# Altium PCB PCB1.PcbDoc
Units mm, origin at the board's own origin, x right, y up, seen from the top; angles counter-clockwise.
Board outline 124.33 x 100.71 mm, 2 copper layers (Top Layer, Bottom Layer); 39 components, 28 nets, 205 pads, 12 vias.
Unrouted connection lines stored in the file: 118.
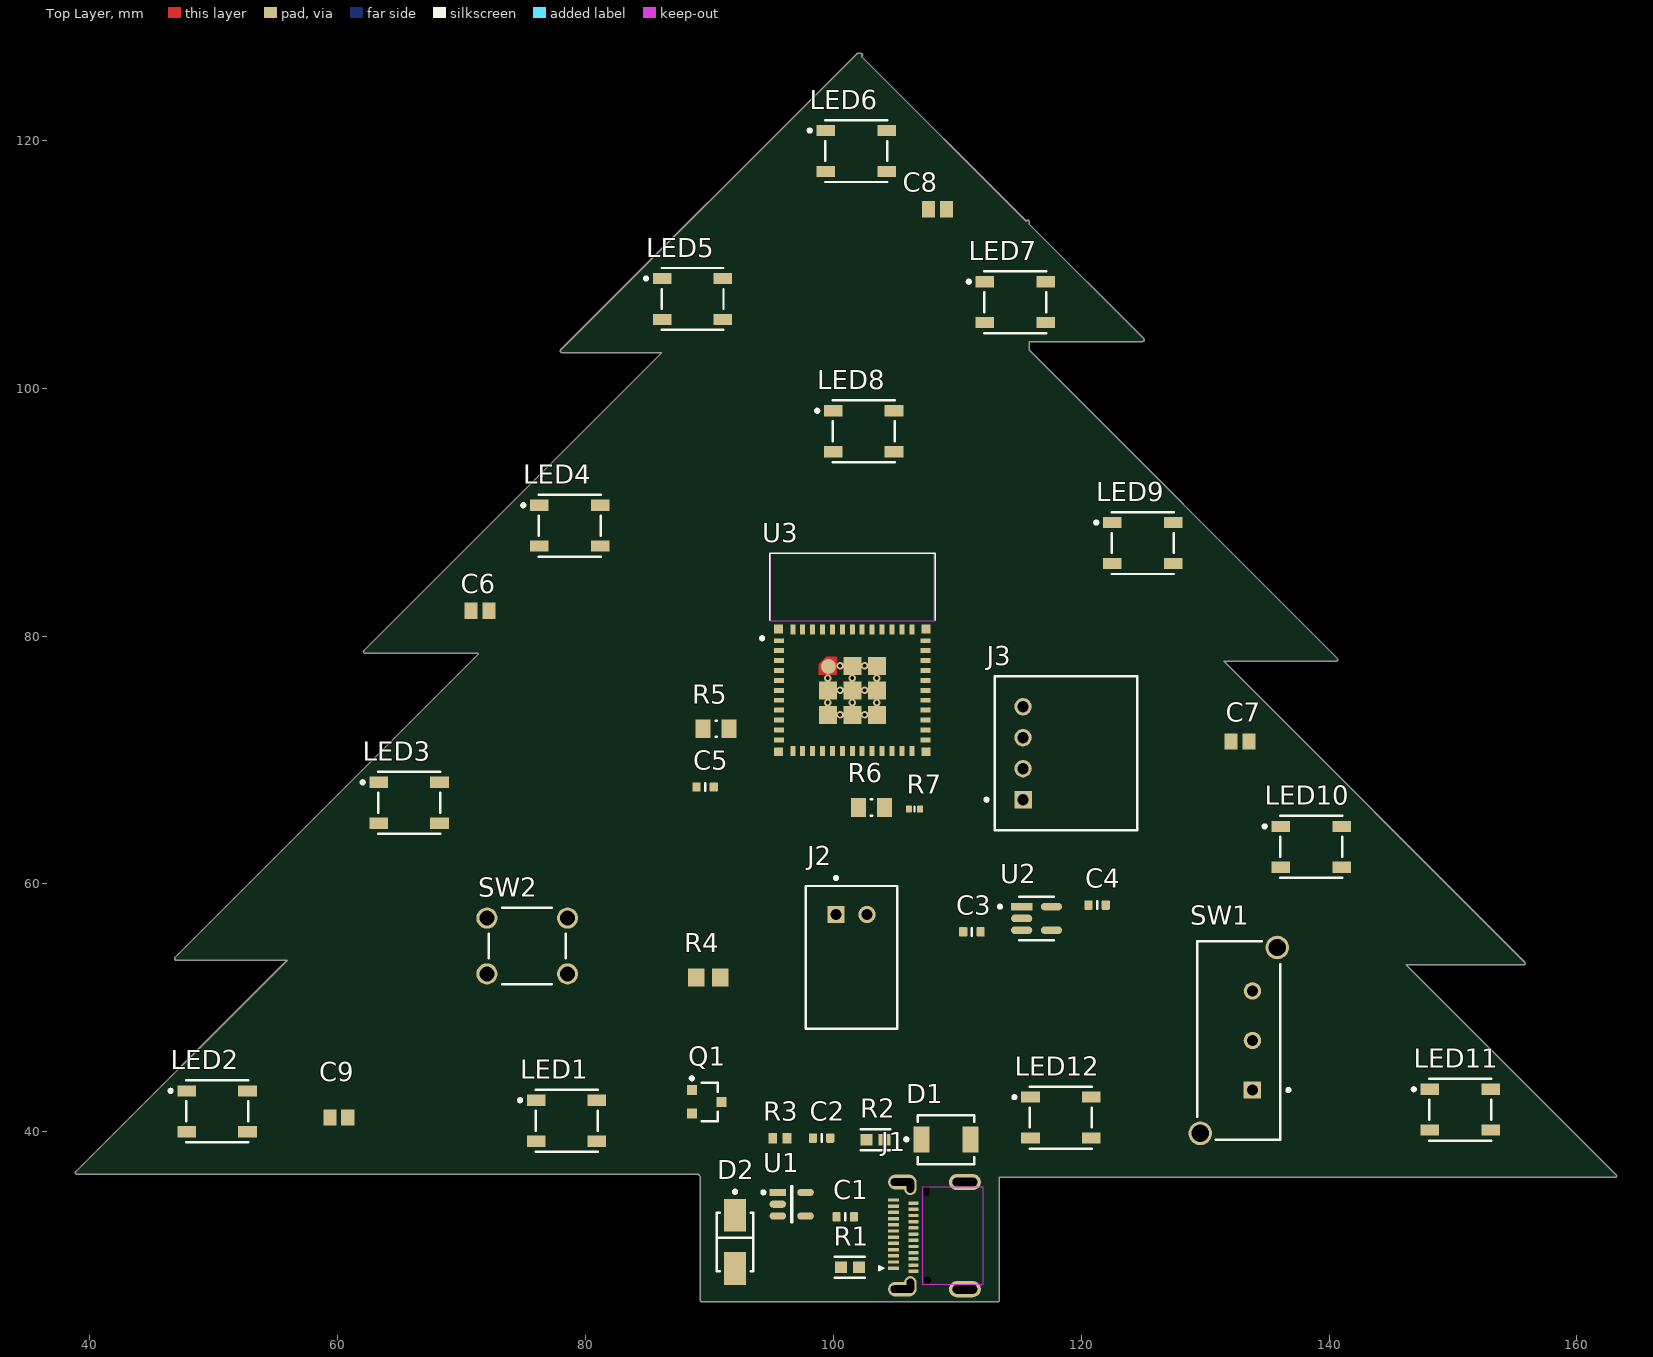
[diagram p0: Top Layer view]
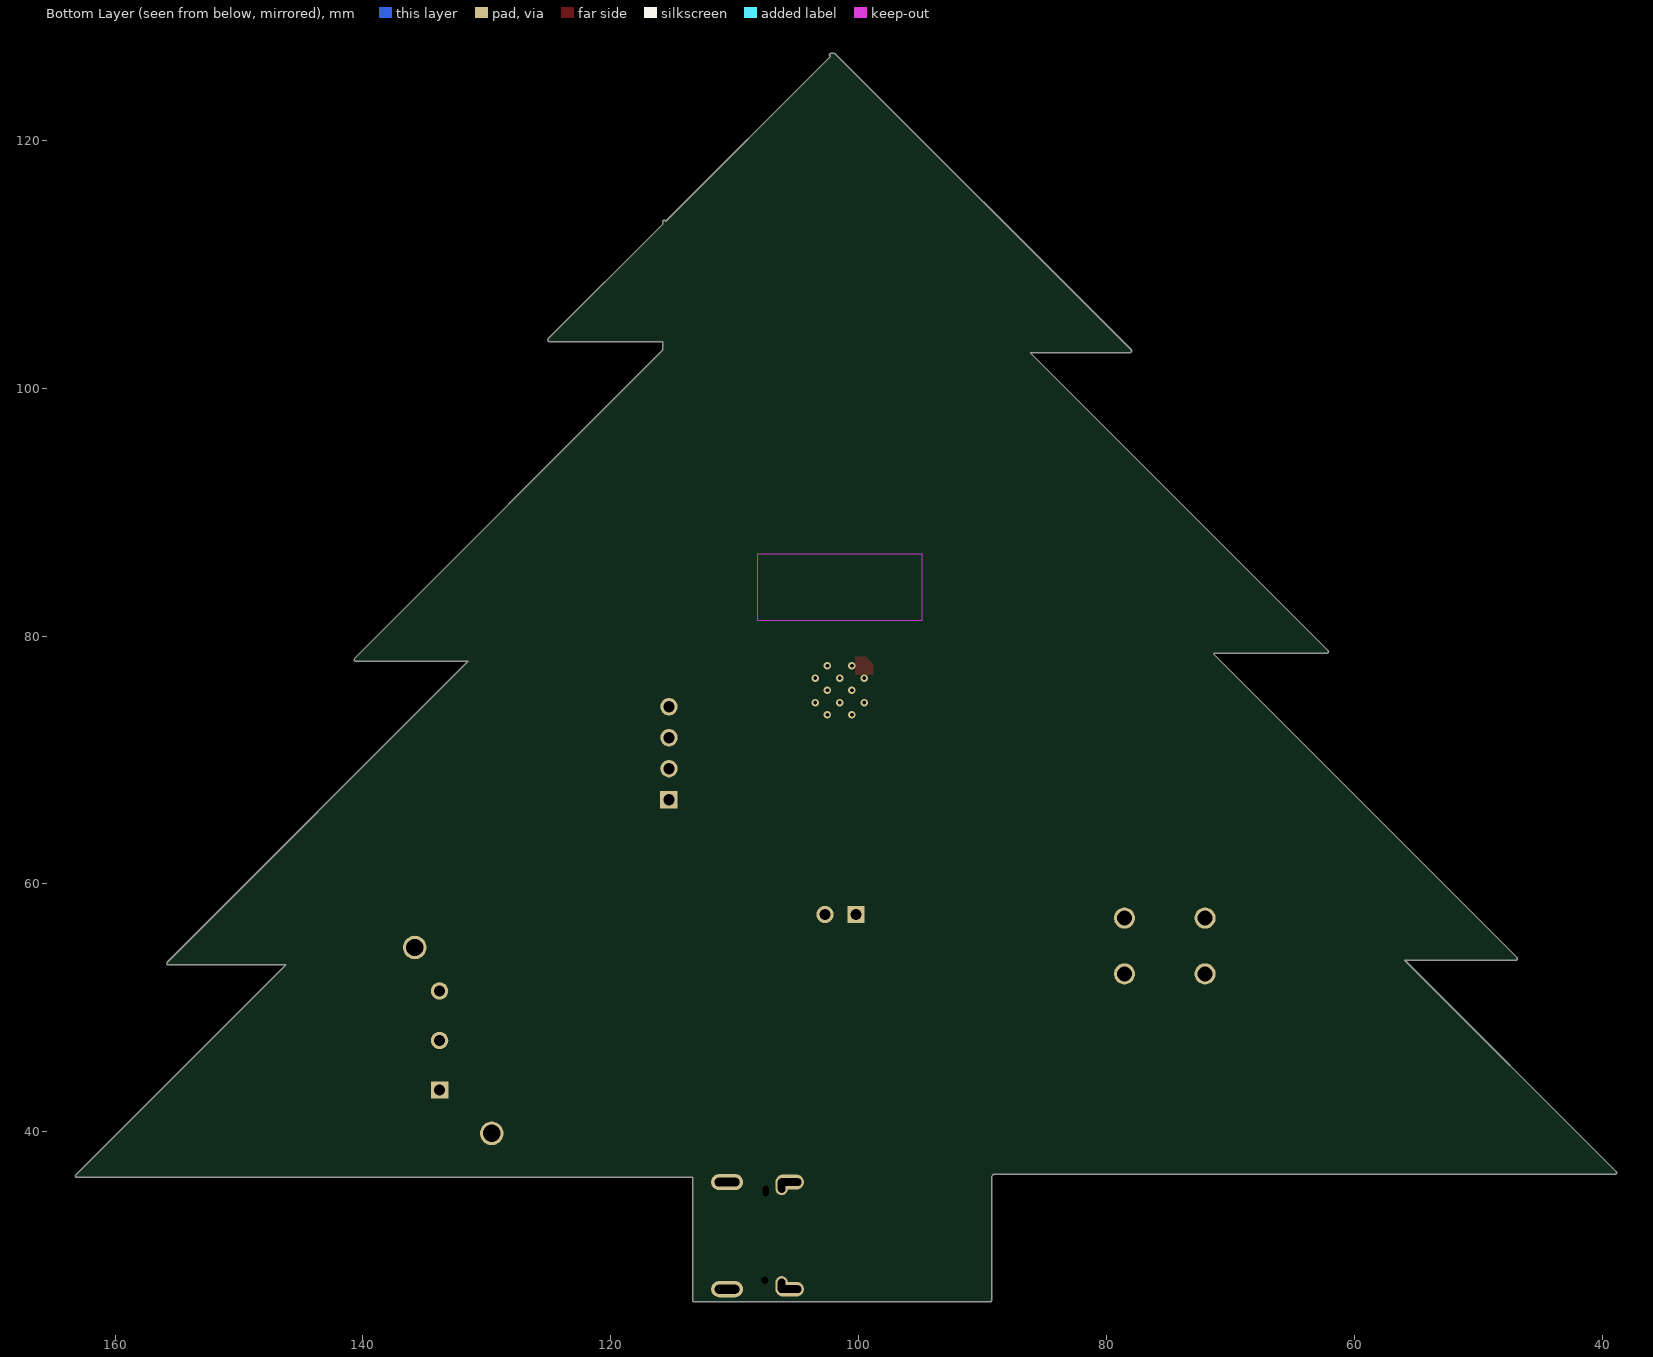
[diagram p1: Bottom Layer view, seen from below]

## Layer stack, top to bottom
Top Solder: solder mask 0.0102, Solder Resist, Dk 3.5
Top Layer: signal copper 0.0356
Dielectric 1: dielectric 0.32, FR-4, Dk 4.8
Bottom Layer: signal copper 0.0356
Bottom Solder: solder mask 0.0102, Solder Resist, Dk 3.5

## Board outline
38.989,36.576 cw(c38.989,36.703) 38.899,36.794 38.899,36.793 55.953,53.848 46.99,53.848 cw(c46.99,53.975) 46.9,54.066 46.9,54.065 71.374,78.539 71.321,78.613 62.23,78.613 cw(c62.23,78.74) 62.14,78.831 62.14,78.83 86.179,102.87 78.105,102.87 cw(c78.105,102.997) 78.015,103.088 78.015,103.087 101.891,126.963 101.981,127 102.235,127 cw(c102.235,126.873) 102.362,126.873 cw(c102.235,126.873) 102.28,126.754 115.578,113.456 cw(c115.697,113.411) 115.824,113.411 115.824,113.21 125.058,103.976 125.095,103.886 cw(c124.968,103.886) 124.968,103.759 115.824,103.759 115.824,103.05 140.679,78.195 140.716,78.105 cw(c140.589,78.105) 140.589,77.978 131.499,77.978 155.792,53.684 155.829,53.594 cw(c155.702,53.594) 155.702,53.467 146.231,53.467 163.158,36.539 163.195,36.449 cw(c163.068,36.449) 163.068,36.322 113.411,36.322 113.411,26.416 cw(c113.284,26.416) 113.284,26.289 89.408,26.289 cw(c89.408,26.416) 89.281,26.416 89.281,36.396 89.101,36.576

## Design rules (kind name [scope] priority, off if disabled: settings)
Clearance [All] p1: gap=0.254 ignorepadtopadclearanceinfootprint=FALSE
PolygonConnect [All] p1: connectstyle=Relief reliefconductorwidth=0.254 reliefentries=4 polygonreliefangle="90 Angle" airgapwidth=0.254
RoutingVias [All] p1: holewidth=0.711 width=1.27 viastyle="Through Hole" minholewidth=0.711 minwidth=1.27 maxholewidth=0.711 maxwidth=1.27
SolderMaskExpansion [All] p1: expansion=0 istentingtop=FALSE
SupplyNets "Schematic Supply Nets_1" [InNet('5V_USB')] p1: voltage=0.000
SupplyNets "Schematic Supply Nets" [InNet('GND')] p2: voltage=0.000
Width [All] p1: maxlimit=0.254 minlimit=0.254 preferedwidth=0.254
30 further rules are at their usual default settings.

## Components (designator, comment, footprint, x,y, rotation, side; value= is the part's Value field where it differs from the comment)
C1 "Capacitor 470nF +/-20% 25V 0603" CAPC0603(1608)100_L 100.965,33.147 r0 top value=470nF
C2 "Capacitor 470nF +/-20% 25V 0603" CAPC0603(1608)100_L 99.06,39.497 r0 top value=470nF
C3 "Capacitor 470nF +/-20% 25V 0603" CAPC0603(1608)100_L 111.187,56.134 r0 top value=470nF
C4 "Capacitor 470nF +/-20% 25V 0603" CAPC0603(1608)100_L 121.285,58.293 r0 top value=470nF
C5 "Capacitor 470nF +/-20% 25V 0603" CAPC0603(1608)100_L 89.662,67.818 r0 top value=470nF
C6 "Capacitor 100 nF +/-10% 50 V 0805" CAPC2013X95X50LL10T25 71.501,82.042 r0 top value=100nF
C7 "Capacitor 100 nF +/-10% 50 V 0805" CAPC2013X95X50LL10T25 132.805,71.501 r0 top value=100nF
C8 "Capacitor 100 nF +/-10% 50 V 0805" CAPC2013X95X50LL10T25 108.421,114.427 r0 top value=100nF
C9 "Capacitor 100 nF +/-10% 50 V 0805" CAPC2013X95X50LL10T25 60.108,41.148 r0 top value=100nF
D1 "TVS" FP-SMBJ-MFG 109.093,39.37 r0 top
D2 "Diode Schottky" FP-403AE-MFG 92.075,31.115 r90 top
J1 "Type-C Connector" JAE-DX07S024JJ3_V 107.569,31.623 r90 top
J2 "Battery connector" JST-S2B-XH-A(LF)(SN)_V 101.473,57.531 r0 top
J3 "UART Programming Header" JST-S4B-XH-A(LF)(SN)_V 115.316,70.545 r90 top
LED1 "WS2812B" ADAI-WS2812B_V 78.486,40.894 r0 top
LED2 "WS2812B" ADAI-WS2812B_V 50.292,41.656 r0 top
LED3 "WS2812B" ADAI-WS2812B_V 65.786,66.548 r0 top
LED4 "WS2812B" ADAI-WS2812B_V 78.74,88.9 r0 top
LED5 "WS2812B" ADAI-WS2812B_V 88.646,107.188 r0 top
LED6 "WS2812B" ADAI-WS2812B_V 101.854,119.126 r0 top
LED7 "WS2812B" ADAI-WS2812B_V 114.681,106.934 r0 top
LED8 "WS2812B" ADAI-WS2812B_V 102.452,96.521 r0 top
LED9 "WS2812B" ADAI-WS2812B_V 124.968,87.503 r0 top
LED10 "WS2812B" ADAI-WS2812B_V 138.557,62.992 r0 top
LED11 "WS2812B" ADAI-WS2812B_V 150.585,41.784 r0 top
LED12 "WS2812B" ADAI-WS2812B_V 118.364,41.148 r0 top
Q1 "P-MOSFET" AO-SOT-23-3L_V 89.789,42.418 r0 top
R1 "5.1 kOm" FP-MCR03-IPC_B 101.346,29.083 r0 top value=5.1kR
R2 "5.1 kOm" FP-MCR03-IPC_B 103.413,39.37 r0 top value=5.1kR
R3 "2 kOm" RESC1609X50X30LL10T20 95.691,39.497 r0 top
R4 "Resistor 100k +/-1% 0805 125 mW" RESC2013X70X40ML20T20 89.916,52.451 r0 top value=100k
R5 "Resistor 10k +/-1% 0805 125 mW" RESC2013X50X35ML15T15 90.551,72.517 r0 top value=10k
R6 "Resistor 10k +/-1% 0805 125 mW" RESC2013X50X35ML15T15 103.09,66.167 r0 top value=10k
R7 "Resistor 330R +/-5 % 0402 63 mW" RESC0402(1005)_L 106.553,66.04 r0 top value=330
SW1 "Main Power Switch" TECO-1825255-1_V 132.715,47.371 r90 top
SW2 "Reset Push Button" BEST-TS-1109_V 75.311,54.991 r0 top
U1 "Battery Charger" FP-C04-091-OT-IPC_B 96.647,34.163 r0 top
U2 "LDO" FP-SOT25-IPC_A 116.401,57.216 r0 top
U3 "ESP32-C3 Main Microcontroller Module" FP-ESP32-C3-MINI-1-H4-MFG 101.537,75.618 r0 top

## Footprints (in the part's own frame and the unit in brackets; to place one, negate y for a bottom-side part, rotate by r counter-clockwise, add the part's x,y. Pads: shape width x height; smd on the part's side, far side on the other; paste and mask are expansions set on the pad)
ADAI-WS2812B_V [mm] "SMD, 4-Leads, Body 5x5mm, Pitch 3.3mm"
  rect 1.5x0.9 smd: 1(-2.45,1.65) 2(-2.45,-1.65) 3(2.45,-1.65) 4(2.45,1.65)
  silkscreen extent -3.87,-2.5 2.5,2.5, body extent -2.7,-2.5 2.7,2.5, height 1.69
AO-SOT-23-3L_V [mm] "SOT23, 3-Leads, Body 3.1x1.8mm, Pitch 0.95mm"
  rect 0.8x0.8 smd: 1(-1.2,0.95) 2(-1.2,-0.95) 3(1.2,0)
  silkscreen extent -1.32,-1.55 0.9,2.02, body extent -1.5,-1.55 1.5,1.55, height 1.25
BEST-TS-1109_V [mm] "THD, 4-Leads, Body 6.2x6.2mm"
  round 1.7 hole 1.2: 1(-3.25,2.25) 2(3.25,2.25) 3(-3.25,-2.25) 4(3.25,-2.25)
  silkscreen extent -3.1,-3.1 3.1,3.1
CAPC0603(1608)100_L [mm] "Chip Capacitor, Body 1.6x0.8mm, Height 1.0mm, IPC High Density"
  rrect25% 0.66x0.76 smd: 1(-0.7,0) 2(0.7,0)
  silkscreen extent 0,-0.3 0,0.3, body extent -0.8,-0.4 0.8,0.4, height 0.95
CAPC2013X95X50LL10T25 [mm] "Chip Capacitor, 2-Leads, Body 2.10x1.35mm, IPC High Density"
  rect 1.05x1.3 smd: 1(-0.725,0) 2(0.725,0)
  body extent -1.05,-0.67 1.05,0.67, height 0.95
FP-403AE-MFG [mm]
  rect 2.65x1.75 smd paste+0 mask+0: 1(-2.15,0) 2(2.15,0)
  silkscreen extent -2.37,-1.48 4.17,1.48, body extent -3.57,-1.58 3.57,1.58, height 0.25
FP-C04-091-OT-IPC_B [mm]
  rect 1.338x0.578 smd paste+0 mask+0: 1(-1.116,0.95)
  rrect100% 1.338x0.578 smd paste+0 mask+0: 2(-1.116,0) 3(-1.116,-0.95) 4(1.116,-0.95) 5(1.116,0.95)
  silkscreen extent -2.41,-1.45 0.05,1.45
FP-ESP32-C3-MINI-1-H4-MFG [mm]
  rect 0.8x0.4 smd paste+0 mask+0: 1(-5.9,4) 2(-5.9,3.2) 3(-5.9,2.4) 4(-5.9,1.6) 5(-5.9,0.8) 6(-5.9,0) 7(-5.9,-0.8) 8(-5.9,-1.6) 9(-5.9,-2.4) 10(-5.9,-3.2) 11(-5.9,-4) 25(5.9,-4) 26(5.9,-3.2) 27(5.9,-2.4) 28(5.9,-1.6) 29(5.9,-0.8) 30(5.9,0) 31(5.9,0.8) 32(5.9,1.6) 33(5.9,2.4) 34(5.9,3.2) 35(5.9,4)
  rect 0.4x0.8 smd paste+0 mask+0: 12(-4.8,-4.9) 13(-4,-4.9) 14(-3.2,-4.9) 15(-2.4,-4.9) 16(-1.6,-4.9) 17(-0.8,-4.9) 18(0,-4.9) 19(0.8,-4.9) 20(1.6,-4.9) 21(2.4,-4.9) 22(3.2,-4.9) 23(4,-4.9) 24(4.8,-4.9) 36(4.8,4.9) 37(4,4.9) 38(3.2,4.9) 39(2.4,4.9) 40(1.6,4.9) 41(0.8,4.9) 42(0,4.9) 43(-0.8,4.9) 44(-1.6,4.9) 45(-2.4,4.9) 46(-3.2,4.9) 47(-4,4.9) 48(-4.8,4.9)
  rect 1.45x1.45 smd paste+0 mask+0: 49(-1.975,-1.975) 49(-1.975,0) 49(0,-1.975) 49(0,0) 49(0,1.975) 49(1.975,-1.975) 49(1.975,0) 49(1.975,1.975)
  round 1.207 smd paste+0 mask+0: 49(-1.926,1.926)
  rect 0.7x0.7 smd paste+0 mask+0: 50(5.95,4.95) 51(5.95,-4.95) 52(-5.95,-4.95) 53(-5.95,4.95)
  Top Layer region: -2.7,1.25 -2.7,2.1 -2.1,2.7 -1.25,2.7 -1.25,1.25
  Keep-Out Layer region: -6.6,5.6 6.6,5.6 6.6,11 -6.6,11
  silkscreen extent -7.4,4.08 6.68,11.07, body extent -6.78,-5.77 6.78,11.17, height 0.25
FP-MCR03-IPC_B [mm]
  rect 0.958x0.912 smd paste+0 mask+0: 1(-0.727,0) 2(0.727,0)
  silkscreen extent -1.21,-0.86 1.21,0.86, body extent -1.46,-0.71 1.46,0.71, height 0.25
FP-SMBJ-MFG [mm]
  rect 1.27x2.1 smd paste+0 mask+0: 1(-1.98,0) 2(1.98,0)
  silkscreen extent -3.32,-1.97 2.28,1.97, body extent -2.72,-2.07 2.72,2.07, height 0.25
FP-SOT25-IPC_A [mm]
  rect 1.707x0.616 smd paste+0 mask+0: 1(-1.201,0.95)
  rrect100% 1.707x0.616 smd paste+0 mask+0: 2(-1.201,0) 3(-1.201,-0.95) 4(1.201,-0.95) 5(1.201,0.95)
  silkscreen extent -3.08,-1.75 1.4,1.75, body extent -2.55,-2 2.55,2, height 0.25
JAE-DX07S024JJ3_V [mm] "THD, 24-Leads, Body 8.17x8.94mm, Pitch 0.5mm"
  oval 1.2x2.3 hole 0.6 slot 1.9 at 90 deg: 1(-4.32,2) 2(4.32,2)
  oval 1.5x1 hole 0.6 slot 1.1 at 0 deg: 1(-4.02,1.35) 2(4.02,1.35)
  oval 1.3x2.6 hole 0.7 slot 2 at 90 deg: 3(-4.32,-3.05) 4(4.32,-3.05)
  rrect25% 0.27x0.9 smd: A1(-2.625,2.7) A2(-2.125,2.7) A3(-1.625,2.7) A4(-1.125,2.7) A5(-0.625,2.7) A6(-0.125,2.7) A7(0.375,2.7) A8(0.875,2.7) A9(1.375,2.7) A10(1.875,2.7) A11(2.375,2.7) A12(2.875,2.7)
  rrect25% 0.27x0.8 smd: B1(2.625,1.1) B2(2.125,1.1) B3(1.625,1.1) B4(1.125,1.1) B5(0.625,1.1) B6(0.125,1.1) B7(-0.375,1.1) B8(-0.875,1.1) B9(-1.375,1.1) B10(-1.875,1.1) B11(-2.375,1.1) B12(-2.875,1.1)
  round 0 hole 0.6 unplated: H1(-3.6,0)
  round 0 hole 0.5 slot 0.85 at 0 deg unplated: H2(3.6,0.065)
  Top Layer keep-out region: -3.9,-4.55 3.9,-4.55 3.9,0.4 -3.9,0.4
  silkscreen extent -2.83,3.49 -2.43,3.89, body extent -4.47,-5.35 4.47,2.8, height 3.16
JST-S2B-XH-A(LF)(SN)_V [mm] "Header, 2-Leads, Body 7.4x11.5mm, Pitch 2.5mm"
  rect 1.4x1.4 hole 0.9: 1(-1.25,0)
  round 1.4 hole 0.9: 2(1.25,0)
  silkscreen extent -3.7,-9.2 3.7,3.08, body extent -3.7,-9.2 3.7,2.3, height 5.95
JST-S4B-XH-A(LF)(SN)_V [mm] "Header, 4-Leads, Body 12.4x11.5mm, Pitch 2.5mm"
  rect 1.4x1.4 hole 0.9: 1(-3.75,0)
  round 1.4 hole 0.9: 2(-1.25,0) 3(1.25,0) 4(3.75,0)
  silkscreen extent -6.2,-9.2 6.2,3.07, body extent -6.2,-9.2 6.2,2.3, height 6.15
RESC0402(1005)_L [mm] "Chip Resistor, Body 1.0x0.5mm, IPC High Density"
  rrect25% 0.5x0.55 smd: 1(-0.45,0) 2(0.45,0)
  silkscreen extent 0,-0.2 0,0.2, body extent -0.5,-0.25 0.5,0.25, height 0.3
RESC1609X50X30LL10T20 [mm] "Chip Resistor, 2-Leads, Body 1.55x0.85mm, IPC High Density"
  rect 0.7x0.85 smd: 1(-0.575,0) 2(0.575,0)
  body extent -0.82,-0.48 0.82,0.48, height 0.5
RESC2013X50X35ML15T15 [mm] "Chip Resistor, 2-Leads, Body 2.2x1.4mm, IPC Low Density"
  rect 1.2x1.5 smd: 1(-1.05,0) 2(1.05,0)
  silkscreen extent -0.05,-0.65 0.05,0.65, body extent -1.1,-0.7 1.1,0.7, height 0.5
RESC2013X70X40ML20T20 [mm] "Chip Resistor, 2-Leads, Body 2.2x1.35mm, IPC Low Density"
  rect 1.35x1.45 smd: 1(-0.975,0) 2(0.975,0)
  body extent -1.1,-0.67 1.1,0.67, height 0.7
TECO-1825255-1_V [mm] "THD, 5-Leads, Body 6.7x16mm, Pitch 4mm"
  rect 1.4x1.4 hole 0.9: 1(-4,-1.1)
  round 1.4 hole 0.9: 2(0,-1.1) 3(4,-1.1)
  round 1.9 hole 1.4: MH1(-7.5,3.1) MH2(7.5,-3.1)
  silkscreen extent -8,-4.13 8,3.35, body extent -8,-3.35 8,3.35, height 12

## Part data
C1 C2 C3 C4 C5: library part CMP-001-00077-3, "Chip Capacitor, 470nF +/-20%, 25V, 0603, Thickness 1 mm", Case/Package=0603, Max Operating Temperature=85°C, Min Operating Temperature=-55°C, Tolerance=10%, Voltage Rating=25V, Mounting Technology=SMT, Pins=2
C6 C7 C8 C9: library part CMP-001-00018-6, "Chip Capacitor, 100 nF, +/- 10%, 50 V, 0805 (2012 Metric)", Capacitor Type=Ceramic, Case/Package=0805, Max Operating Temperature=125°C, Min Operating Temperature=-55°C, Tolerance=10%, Voltage Rating=50V, Mounting Technology=SM, Pins=2, RoHS Compliant=True
D1: library part CMP-07401-000003-1, "TVS DIODE 5V 9.2V SMB", Breakdown Voltage=6.4V, Clamping Voltage=9.2V, Manufacturer="Bourns Inc.", Manufacturer Part Number=SMBJ5.0A, Max Junction Temp=+150°C, Package=SMBJ, Peak Pulse Current=65.3A, Peak Pulse Power=600W, Reverse Standoff Voltage=5V, Temperature="-55°C to +150°C", Temperature Range Low=-55°C, Automotive=No, Category=Diode, ComponentLink2Description=Datasheet, ComponentLink2URL=https://www.bourns.com/docs/Product-Datasheets/SMBJ.pdf, Device Class L1="Circuit Protection", Device Class L2="TVS Diodes", Device Class L3=unset, Digikey Description="TVS DIODE 5V 9.2V SMB", Direction=Unidirectional, Height=2.44mm, Lead Free=Yes, Mouser Description="Dio Tvs Vwm 5.0V 600W Unidir Smb Rohs Compliant: Yes", Number Of Channels=1, Octopart=https://octopart.com/smbj5.0a-bourns-12809487, RoHS=TRUE, Standoff Height=0.05mm, Temperature Range High=+150°C
D2: library part CMP-2000-04943-2, "DIODE SCHOTTKY 40V 1A SMA", Forward Current=1A, Manufacturer="ON Semiconductor", Manufacturer Part Number=SS14, Max Junction Temp=+125°C, Max Repetitive Reverse Voltage=40V, Max Surge Forward Current=40A, Package=403AE, Peak Reverse Current=0.2mA, Temperature="-65°C to +125°C", Temperature Range Low=-65°C, Automotive=No, Category=Diode, ComponentLink2Description=Datasheet, ComponentLink2URL=https://www.onsemi.com/pub/Collateral/SS19-D.PDF, Device Class L1="Discrete Semiconductors", Device Class L2=Diodes, Device Class L3="Schottky Diodes", Digikey Description="DIODE SCHOTTKY 40V 1A SMA", Height=2.5mm, Lead Free=Yes, Mouser Description="Schottky Diodes & Rectifiers SMA 40V 1.0A", Octopart=https://octopart.com/ss14-on+semiconductor-29205033, RoHS=TRUE, Standoff Height=0.05mm, Temperature Range High=+125°C
J1: library part CMP-002-00065-3, "USB-C Connector, 20 V, 1.25 A, -30 to 80 degC, RoHS, Tape and Reel", Connector Type=USB-C, Gender=Receptacle, Pins=28
J2: library part CMP-002-00032-2, "Male Header, Pitch 2.5 mm, 1 x 2 Position, Height 6.1 mm, Tail Length 3.4 mm, -25 to 85 degC, RoHS, Bulk", Case/Package=S2B-XH-A(LF)(SN), Manufacturer=JST, Max Operating Temperature=85°C, Min Operating Temperature=-25°C, Package Description="XH Series Disconnectable Crimp Style Connector, Pitch 2.5 mm, 1 x 2 Position, Height 6.1 mm, Tail Length 3.4 mm", Connector Type=Header, Datasheet URL=http://www.jst-mfg.com/product/pdf/eng/eXH.pdf, Datasheet Version=May-16, Gender=Male, Manufacturer URL=http://www.jst.com/home2.html, Mounting Technology=TH, Package Reference=S2B-XH-A(LF)(SN), RoHS Compliant=Unknown
J3: library part CMP-002-00034-2, "Male Header, Pitch 2.5 mm, 1 x 4 Position, Height 6.1 mm, Tail Length 3.4 mm, -25 to 85 degC, RoHS, Bulk", Case/Package=S4B-XH-A(LF)(SN), Manufacturer=JST, Max Operating Temperature=85°C, Min Operating Temperature=-25°C, Package Description="XH Series Disconnectable Crimp Style Connector, Pitch 2.5 mm, 1 x 4 Position, Height 6.1 mm, Tail Length 3.4 mm", Connector Type=Header, Datasheet URL=http://www.jst-mfg.com/product/pdf/eng/eXH.pdf, Datasheet Version=May-16, Gender=Male, Manufacturer URL=http://www.jst.com/home2.html, Mounting Technology=TH, Package Reference=S4B-XH-A(LF)(SN), RoHS Compliant=Unknown
LED1 LED2 LED3 LED4 LED5 LED6 LED7 LED8 LED9 LED10 LED11 LED12: library part CMP-007-00035-2, "Intelligent Control LED Integrated Light Source, 3.5 to 5.3 V, -25 to 80 degC, 4-Pin SMD, RoHS, Bulk", Manufacturer="Adafruit Industries", Package Description="4-Pin Surface Mount Device, Body 5 x 5 mm, Pitch 3.3 mm", Case/Package=WS2812B, Datasheet URL=https://cdn-shop.adafruit.com/datasheets/WS2812B.pdf, Datasheet Version=May-13, Manufacturer URL=https://www.adafruit.com/, Mounting Technology=SM, Package Reference=WS2812B, RoHS Compliant=False
Q1: library part CMP-2000-05778-1, "P-Channel MOSFET, 30 V, 4 A, -55 to 150 degC, 3-Pin SOT-23-3L, RoHS, Tape and Reel", Continuous Drain Current=4A, Drain-Source On-Volt=30V, Frequency (Max)=NotRequiredMHz, Gate-Source Voltage (Max)=?12V, Manufacturer="Alpha and Omega", Operating Temp Range=-55Cto150C, Operating Temperature Classification=Military, Output Power (Max)=NotRequiredW, Package Description="3-Pin Small Outline Transistor, Body 2.95 x 1.6 mm, Pitch 0.95 mm", Package Reference=SOT-23-3L, Package Type=SOT-23, Power Dissipation=1.4W, Power Gain=NotRequireddB, Channel Mode=Enhancement, Datasheet URL=http://www.aosmd.com/res/data_sheets/AO3401A.pdf, Datasheet Version="Rev. 3, 03/2011", Drain Current (Max)=4A, Drain Efficiency=NotRequired%, Drain-Source On-Res=0.044ohm, Manufacturer URL=http://www.aosmd.com/, Mounting=SurfaceMount, Mounting Technology=SurfaceMount, Noise Figure=NotRequireddB, Number of  Elements=1, Package URL=http://www.aosmd.com/res/packaging_information/SOT-23-3L.pdf, Pin Count=3, Polarity=P, Rad Hardened=No, Type=PowerMOSFET
R1 R2: library part CMP-08839-027005-1, "Thick Film Chip Resistor, 0603, 5.1kΩ, 5%, 200ppm/°C, 0.1W, 50V", Case Code (Imperial)=0603, Case Code (Metric)=1608, Max Operating Temperature=155°C, Max Power Dissipation=100mW, Min Operating Temperature=-55°C, Package Quantity=5000, Resistance=5.1kR, Resistor Type="Thick Film", Temperature Coefficient=200ppm/°C, Tolerance=5%, Voltage Rating (DC)=50V, Case/Package=0603, Contact Plating=Tin, Features="Automotive AEC-Q200", Height=0.022inch, Lead Free="Lead Free", Length=0.063inch, Mount="Surface Mount", Number of Terminations=2, Packaging="Tape and Reel", Power Rating=100mW, RoHS Compliant=Yes, Series=MCR, Technology="THICK FILM", Width=0.031inch, Working Voltage=50V
R3: library part CMP-2000-03162-1, Manufacturer="Vishay Dale", Part Number=CRCW06032K00FKTA
R4: library part CMP-009-00024-5, "Chip Resistor, 100 KOhm, +/- 1%, 0.125 W, -55 to 155 degC, 0805 (2012 Metric)", Case/Package=0805, Max Operating Temperature=155°C, Min Operating Temperature=-55°C, Power=125mW, Tolerance=1%, Voltage Rating=150V, Mounting Technology=SM, Pins=2, RoHS Compliant=True
R5 R6: library part CMP-009-00018-5, "Chip Resistor, 10 KOhm, +/- 1%, 125 mW, -55 to 155 degC, 0805 (2012 Metric)", Case/Package=0805, Max Operating Temperature=155°C, Min Operating Temperature=-55°C, Power=125mW, Tolerance=1%, Voltage Rating=150V, Mounting Technology=SM, Pins=2, RoHS Compliant=True
R7: library part CMP-009-00132-3, "Chip Resistor, 330 Ohms, +/-5 %, 63 mW, -55 to 155 degC, 0402", Case/Package=0402, Max Operating Temperature=155°C, Min Operating Temperature=-55°C, Power=63mW, Tolerance=5%, Pins=2
SW1: library part CMP-011-00001-2, "Slide Switch, SPDT, 0.3A, 125 V, -20 to 85 degC, 5-Pin THD, RoHS, Tray", Case/Package=1825255-1, Current Rating=300mA, Manufacturer="TE Connectivity", Max Contact Resistance=30mohm, Max Operating Temperature=85°C, Max Voltage Rating (AC)=125V, Min Operating Temperature=-20°C, Operating Force=600gf, Package Description="5-Pin Through Hole Device, Body 6.7 x 16 mm, Pitch 4 mm", Package Quantity=560, Contact Finish=Silver, Contact Material=Copper, Contact Plating=Silver, Datasheet URL=http://www.te.com/commerce/DocumentDelivery/DDEController?Action=showdoc&DocId=Customer+Drawing%7F1825255%7FA4%7Fpdf%7FEnglish%7FENG_CD_1825255_A4_baseFilename.pdf%7F1825255-1, Datasheet Version="Rev. A4, 03/2014", Manufacturer URL=http://www.te.com/, Max Current Rating=300mA, Mounting Technology=TH, Package Reference=1825255-1, Packaging=Bulk, RoHS Compliant=True, Throw Configuration=SPDT, Voltage Rating (AC)=125V
SW2: library part CMP-011-00002-2, "Tactile Switch, SPST, 12 V, 50 mA, -20 to 80 degC, 4-Pin THD", Case/Package=TS-1109, Manufacturer="Shenzhen Best", Package Description="4-Pin Through Hole Device, Body 6.2 x 6.2 mm", Datasheet URL=http://datasheet.octopart.com/TS-1109-Best-Inc.-datasheet-30458100.pdf, Datasheet Version=Dec-12, Manufacturer URL=www.best-dz.com/, Mounting Technology=TH, Package Reference=TS-1109, RoHS Compliant=Unknown
U1: library part CMP-0133-00143-2, "IC CONTROLLR LI-ION 4.2V SOT23-5", Case/Package=SOT-23, Drain to Source Resistance=350mR, Max Charge Current=500mA, Max Input Voltage=6V, Max Operating Temperature=85°C, Max Output Voltage=4.5V, Max Power Dissipation=1.54W, Min Operating Temperature=-40°C, Min Output Voltage=4.168V, Min Supply Voltage=3.75V, Output Voltage=4.2V, Voltage Rating=4.534V, Contact Plating=Tin, Height=0.051inch, Lead Free="Lead Free", Length=0.122inch, Max Supply Voltage=6V, Mount="Surface Mount", Number of Cells=1, Number Of Channels=1, Number of Outputs=1, Number of Pins=5, Output Current=500mA, Packaging="Tape and Reel", Radiation Hardening=No, REACH SVHC="No SVHC", Termination=SMD/SMT, Weight=0.00709oz, Width=0.071inch
U2: library part CMP-12756-000035-1, "IC REG LINEAR 3.3V 600MA SOT25", Case/Package=SOT-23-5, Dropout Voltage=250mV, Max Input Voltage=6V, Max Operating Temperature=85°C, Max Output Current=600mA, Min Input Voltage=2.5V, Min Operating Temperature=-40°C, Output Voltage=3.3V, Package Quantity=1, Quiescent Current=55uA, Accuracy=1.5%, Height=1.3mm, Lead Free="Lead Free", Length=3.1mm, Mount="Surface Mount", Number of Outputs=1, Number of Pins=5, Number of Regulators=1, Output Current=600mA, Output Type=Fixed, Packaging="Tape and Reel", Polarity=Positive, Width=1.7mm
U3: library part CMP-10700-116589974-1, "Multiprotocol Modules SMD module, ESP32-C3FH4, PCB antenna, -40 C +105 C", Ambient Temperature Range High=85°C, Current - Receiving=84mA, Current - Transmitting=350mA, Max Frequency=2.484GHz, Max Supply Voltage=3.6V, Min Operating Temperature=-40°C, Min Supply Voltage=3V, Data Rate=150Mbps, Height=2.55mm, Interface=SPI, Max Operating Temperature=85°C, Number of GPIO=13

## Via types
v1: diameter 0.6, hole 0.3, Top Layer to Bottom Layer, 12 vias

## Nets (pads, with @x,y where several pads share a name; then routed paths per layer and width w, separated by ;. In a path a pad name is that pad's centre, name@x,y a point inside that pad or via, vN(x,y) a via of type N, cw(c..) or ccw(c..) an arc to the next point about the centre after c; other vN are vias at no path point)
5V_USB: C1.1 D1.1 D2.1 J1.A4 J1.A9 J1.B4 J1.B9 U1.4
+3.3V: C4.1 C5.1 R5.1 U2.5 U3.3
GND: C1.2 C2.2 C3.2 C4.2 C5.2 C6.2 C7.2 C8.2 C9.2 D1.2 J1.A1 J1.A12 J1.B1 J1.B12 J2.2 J3.1 LED1.3 LED2.3 LED3.3 LED4.3 LED5.3 LED6.3 LED7.3 LED8.3 LED9.3 LED10.3 LED11.3 LED12.3 R1.1 R2.2 R3.1 R4.2 SW1.MH1 SW1.MH2 SW2.3 SW2.4 U1.2 U2.2 U3.1 U3.2 U3.11 U3.14 U3.36 U3.37 U3.38 U3.39 U3.40 U3.41 U3.42 U3.43 U3.44 U3.45 U3.46 U3.47 U3.48 U3.49 U3.50 U3.51 U3.52 U3.53
  other v1: 100.549,73.643 102.525,73.643 99.562,74.63 101.537,74.63 103.512,74.63 100.549,75.618 102.525,75.618 99.562,76.606 101.537,76.606 103.512,76.606 100.549,77.593 102.525,77.593
IO9: J3.4 LED1.4 R6.1 R7.2
NetC2_1: C2.1 J2.1 Q1.2 U1.3
NetC7_1: C7.1 LED7.1 LED8.1 LED9.1 LED10.1 LED11.1 LED12.1
NetD2_2: D2.2 Q1.3 SW1.2
NetJ1_A5: J1.A5 R1.2
NetJ1_B5: J1.B5 R2.1
NetLED1_2: LED1.2 LED2.4
NetLED2_2: LED2.2 LED3.4
NetLED3_2: LED3.2 LED4.4
NetLED4_2: LED4.2 LED5.4
NetLED5_2: LED5.2 LED6.4
NetLED6_2: LED6.2 LED7.4
NetLED7_2: LED7.2 LED8.4
NetLED8_2: LED8.2 LED9.4
NetLED9_2: LED9.2 LED10.4
NetLED10_2: LED10.2 LED11.4
NetLED11_2: LED11.2 LED12.4
NetQ1_1: Q1.1 R4.1
NetR3_2: R3.2 U1.5
NetR5_2: R5.2 SW2.1 SW2.2 U3.8
NetR6_2: R6.2 U3.23
NetR7_1: R7.1 U3.22
RXD0: J3.3 U3.30
SYS_VCC_SW: C3.1 C6.1 C8.1 C9.1 LED1.1 LED2.1 LED3.1 LED4.1 LED5.1 LED6.1 SW1.1 U2.1 U2.3
TXD0: J3.2 U3.31
pads on no net: J1.1 J1.2 J1.3 J1.4 J1.A2 J1.A3 J1.A6 J1.A7 J1.A8 J1.A10 J1.A11 J1.B2 J1.B3 J1.B6 J1.B7 J1.B8 J1.B10 J1.B11 J1.H1 J1.H2 LED12.2 SW1.3 U1.1 U2.4 U3.4 U3.5 U3.6 U3.7 U3.9 U3.10 U3.12 U3.13 U3.15 U3.16 U3.17 U3.18 U3.19 U3.20 U3.21 U3.24 U3.25 U3.26 U3.27 U3.28 U3.29 U3.32 U3.33 U3.34 U3.35

## Silkscreen, mask and mechanical layers (free items; w line width, h text height)
Mechanical 1:
  lines w0.254: 64.675,26.162 64.929,26.416 ; 102.235,126.873 101.981,126.873 ; 112.776,36.703 112.776,46.736 ; 113.284,26.416 89.408,26.416 89.408,36.449 89.154,36.703 38.989,36.703 56.261,53.975 46.99,53.975 71.501,78.486 71.501,78.613 71.374,78.74 62.23,78.74 86.487,102.997 78.105,102.997 101.981,126.873 ; 113.284,36.449 163.068,36.449 145.796,53.721 145.923,53.594 155.702,53.594 131.191,78.105 140.589,78.105 115.443,103.251 115.443,103.886 124.968,103.886 101.981,126.873 ; 115.697,113.411 115.697,102.87 131.445,87.122

## Text inside footprints (layer, text, board x,y; h text height)
J1: Top 3D Body "Board Edge" at 112.869,30.523 h0.5 r90